# Altium PCB SOM_PCB.PcbDoc (part 5 of 5)
Units mil, origin at the board's own origin, x right, y up, seen from the top; angles counter-clockwise.
Board outline 6000 x 4000 mil, 8 copper layers (Top Layer, Int1 (Sign), Int2 (GND), Int3 (Sign), Int4 (Sign), Int5 (PWR), Int6 (Sign), Bottom Layer), stack 60.424 mil thick; 76 components, 194 nets, 972 pads, 571 vias.
Unrouted connection lines stored in the file: 54.
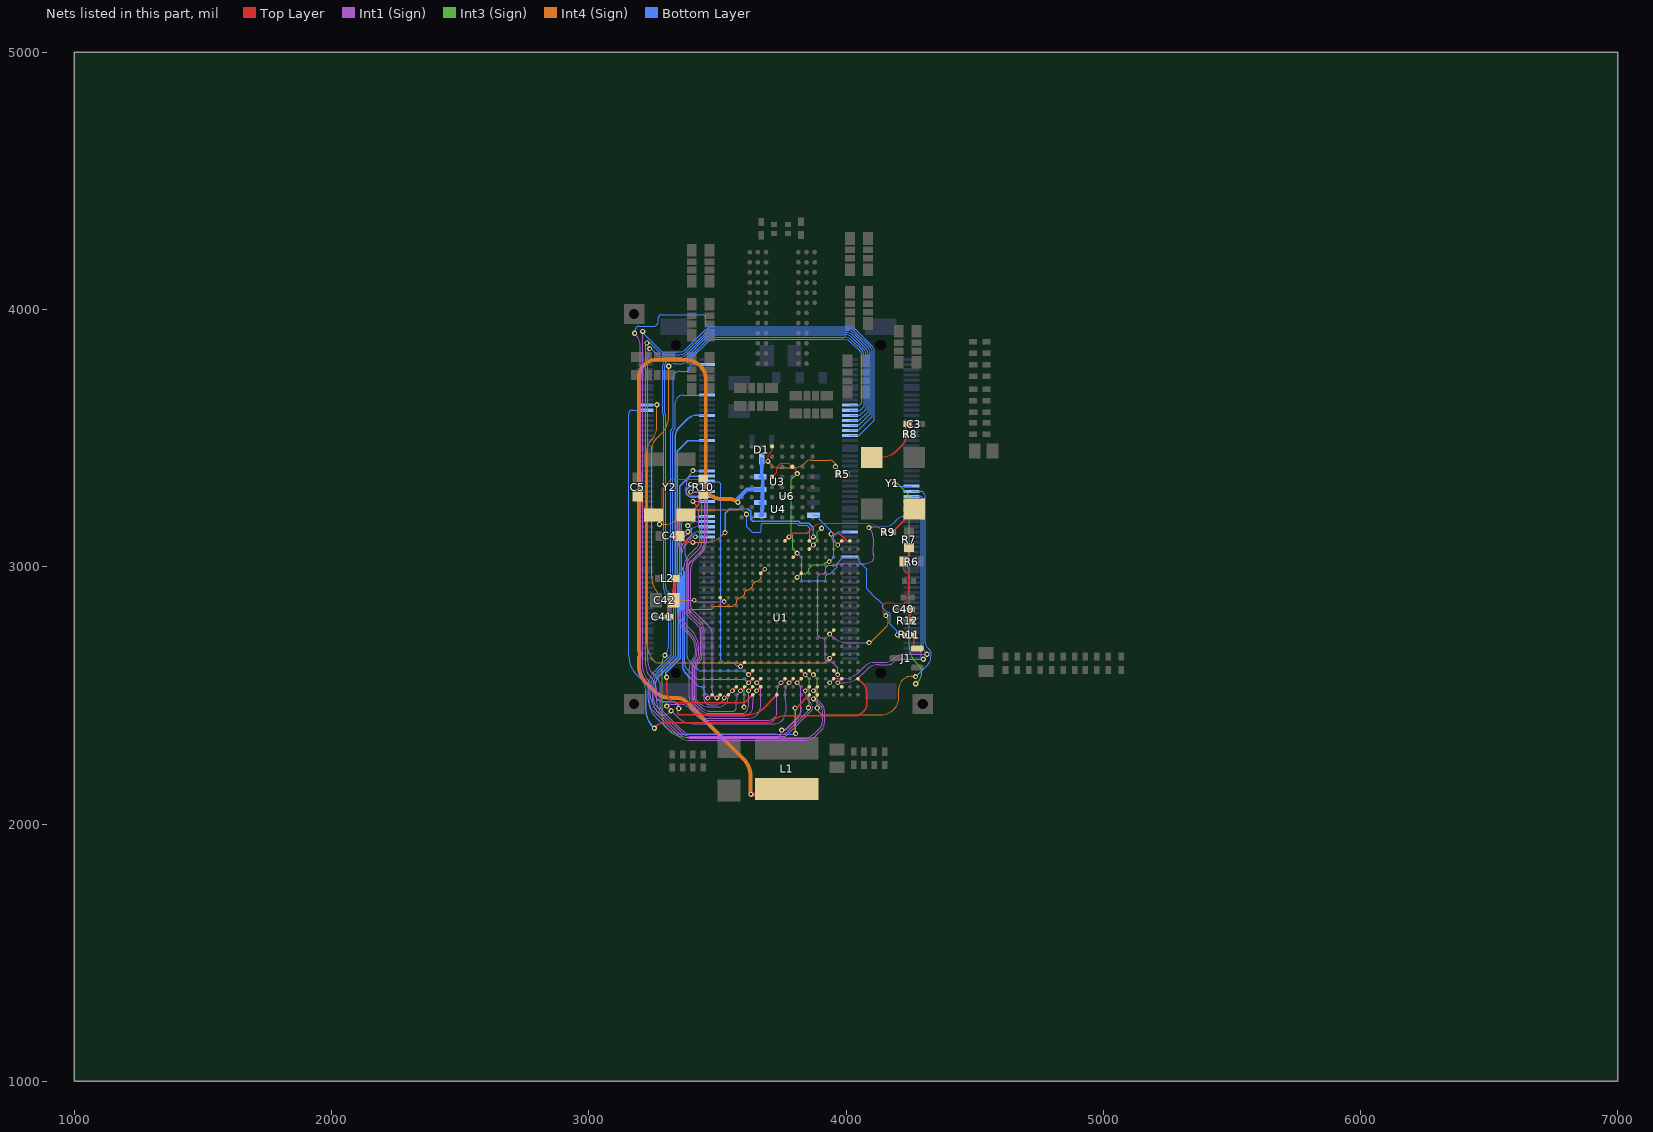
[diagram p10: the nets of this part, all layers, seen from the top]

## Via types
v1: diameter 19, hole 10, Top Layer to Bottom Layer, 330 vias
v2: diameter 20, hole 10, Top Layer to Bottom Layer, 235 vias
v3: diameter 23, hole 11.81, Top Layer to Bottom Layer, 6 vias

## Nets (pads, with @x,y where several pads share a name; then routed paths per layer and width w, separated by ;. In a path a pad name is that pad's centre, name@x,y a point inside that pad or via, vN(x,y) a via of type N, cw(c..) or ccw(c..) an arc to the next point about the centre after c; other vN are vias at no path point) (continued)
NetC3_2: C3.2 R8.2 Y1.1 | length 222.2
  Top Layer w5: Y1.1@4100,3425 4134.64,3425 ccw(c4134.64,3510.36) 4194.96,3449.96 ccw(c4134.64,3510.36) 4195,3450 4220,3475 ccw(c4189.87,3505.13) 4232.48,3505.13 R8.2@4232.48,3515 4232.48,3538.69 cw(c4255.55,3538.69) C3.2@4239.24,3555
NetC4_2: C4.2 R10.1 U1.A14 Y2.1 | length 941.3
  Top Layer w5: v2(3405,3095) 3375.5,3095 C4.2@3350.5,3120 3350.5,3178.64 3373.59,3201.73 Y2.1@3377.99,3201.73 3389.8,3201.73 3428.21,3240.14 3428.21,3265.45 3442.64,3279.88 R10.1@3445,3279.88 ; U1.A14@3857.48,3100.47 v1(3873.23,3116.22)
  Int4 (Sign) w3: v2(3405,3095) 3450.61,3095 ccw(c3450.61,3195) 3508.37,3113.37 ccw(c3450.61,3195) 3521.32,3124.29 v1(3529.67,3132.64)
  Bottom Layer w3: v1(3529.67,3132.64) 3529.67,3134.67 3530,3135 v1@3530,3140 ; v1(3873.23,3116.22) 3873.23,3140
  Bottom Layer w5: v1@3530,3140 3530,3207.2 3546.92,3224.12 3547.8,3224.5 cw(c3549.78,3219.91) 3550.96,3224.77 ccw(c3554.64,3240.86) 3554.8,3224.36 3617.86,3225 cw(c3617.93,3220) 3620.16,3224.47 3620.88,3224.12 3629.75,3215.25 3629.75,3185.25 3637.5,3177.5 3815.48,3177.5 3822.98,3170 3854.97,3170 3873.23,3151.74 3873.23,3140
NetC5_2: C5.2 R10.2 U1.B14 Y2.4 | length 1324.1
  Top Layer w4: C5.2@3190,3274.5 3208,3256.5 3208,3233.93 3240.2,3201.73 Y2.4@3252.01,3201.73 3255.28,3205 Y2.4@3260.93,3205 ; v2(3275,3165) 3275,3190.93 Y2.4@3260.93,3205 ; R10.2@3445,3340.12 3320.12,3340.12 3285.5,3305.5 3285.5,3225.32 3265.18,3205 Y2.4@3260.93,3205
  Top Layer w5: U1.B14@3857.48,3068.98 v1(3873.23,3084.72)
  Int3 (Sign) w3: v1(3873.23,3084.72) 3888.98,3100.47 3888.98,3135.83 3893.14,3140
  Int3 (Sign) w4: 3893.14,3140 3903.14,3150 v2(3905,3150)
  Int4 (Sign) w4: v2(3275,3165) 3299.5,3165 ccw(c3299.5,3214.49) 3334.48,3179.48 3362.86,3207.86 cw(c3395,3175.72) 3395,3221.17 3585,3221.17 cw(c3585,3193.98) 3604.19,3213.25 cw(c3585,3193.98) 3604.23,3213.21 v2(3613.25,3204.18)
  Bottom Layer w3: 3630.18,3140 3635.18,3135 3667.66,3135 3670,3137.34 3670,3140 ; 3859.23,3140 3859.23,3098.72 v1(3873.23,3084.72)
  Bottom Layer w4: v2(3613.25,3204.18) 3615,3202.44 3615,3155.18 3630.18,3140 ; 3670,3140 3670,3164 3675,3169 3808.98,3169 3816.48,3161.5 3846.94,3161.5 3859.23,3149.22 3859.23,3140
NetC40_2: C40.2 R12.1 | length 47.8
  Top Layer w4: C40.2@4250.76,2835 4250.76,2796.76 R12.1@4257.52,2790
NetC41_2: C41.2 C42.2 L2.2 U1.E8 | length 567.5
  Top Layer w5: U1.E8@3668.5,2974.49 v1(3684.25,2990.24)
  Top Layer w12: C41.2@3310.76,2805 C42.2@3310.76,2845 ; C42.2@3316.56,2851.44 3329.41,2864.29 C42.2@3329.41,2870 3329.41,2911.13 3335.51,2917.23 L2.2@3335.51,2955
  Int4 (Sign) w3: 3395,2834 3476.01,2834 3488.76,2846.76 3560.57,2846.76 3574.61,2860.8 3574.61,2868.9 3585.16,2879.44 3593.26,2879.44 3606.15,2892.33 3606.15,2900.44 3616.74,2911.02 3624.84,2911.02 3637.81,2924 3637.81,2932.1 3648.56,2942.85 3656.66,2942.85 3669.97,2956.15 3669.97,2975.95 v1(3684.25,2990.24)
  Int4 (Sign) w4: 3395,2820 3395,2834
NetD1_1: D1.1 L1.1 U6.5 U6.6 U6.7 U6.8 | length 3271.5
  Top Layer w15: v2(3630,2115) 3748.74,2115 L1.1@3770,2136.26
  Int4 (Sign) w3: 3395,2460 3400,2455
  Int4 (Sign) w15: 3395,2460 3382.7,2472.3 ccw(c3340.81,2430.4) 3340.81,2489.65 3321.77,2489.65 cw(c3321.77,2589.65) 3251.06,2518.94 3224.29,2545.71 cw(c3295,2616.42) 3195,2616.42 3195,2649.59 3198.25,2652.85 3198.25,2670.66 3195,2673.91 3195,3736.72 cw(c3263.28,3736.72) 3215,3785 cw(c3263.28,3736.72) 3263.28,3805 3374.64,3805 cw(c3374.64,3719.64) 3435,3780 cw(c3386.72,3731.72) 3455,3731.72 3455,3309.14 ccw(c3489.14,3309.14) 3465,3285 ccw(c3517.24,3337.24) 3517.24,3263.36 3547.74,3263.36 cw(c3547.74,3217.74) 3570.28,3257.41 cw(c3547.74,3217.74) v2(3580,3250) ; 3400,2455 3599.75,2255.25 cw(c3529.04,2184.54) 3629.04,2184.54 3629.04,2115.96 v2(3630,2115)
  Bottom Layer w15: v2(3580,3250) 3580,3265 3615,3300 U6.7@3666.75,3300 U6.7@3672.5,3300 ; U6.5@3666.75,3200 3672.5,3200 3675,3202.5 3675,3204.59 3673.5,3206.09 3673.5,3223.91 3675,3225.41 3675,3247.5 U6.6@3672.5,3250 ; U6.6@3666.75,3250 U6.6@3672.5,3250 ; U6.8@3666.75,3350 U6.8@3669.9,3350 ; D1.1@3672.4,3420 3672.4,3352.5 U6.8@3669.9,3350 ; U6.8@3669.9,3350 3674,3350 3676.5,3347.5 3676.5,3302.5 3674,3300 U6.7@3672.5,3300 ; U6.6@3672.5,3250 3675,3252.5 3675,3297.5 U6.7@3672.5,3300
NetJ1_2: J1.2 R11.1 | length 61.6
  Top Layer w5: R11.1@4262.52,2735 4262.52,2691.26 4271.38,2682.4 J1.2@4276.73,2682.4
NetR5_1: R5.1 U3.A4 | length 394.8
  Top Layer w4: v2(3696.4,3409.75) 3697.11,3410.71 3698.02,3411.62 3698.02,3435.78 3712.52,3450.28 U3.A4@3712.52,3467.48 ; v2(3959.13,3389.22) 3959.97,3388.34 3961.17,3386.64 3970,3377.81 R5.1@3970,3360
  Int4 (Sign) w4: v2(3696.4,3409.75) 3711.35,3394.79 ccw(c3735,3418.44) 3735,3385 3795.67,3385 ccw(c3795.67,3449.78) 3841.47,3403.97 ; 3841.5,3404 3843.66,3406.16 cw(c3865,3384.82) 3865,3415 3934.39,3415 cw(c3934.39,3389.39) 3952.5,3407.5 3952.93,3407.07 3960,3400 3960,3391.59 3959.54,3390.12 v2(3959.13,3389.22)
NetR6_1: R6.1 R7.1 U1.M17 | length 706
  Top Layer w4: v2(4155,2810) 4144,2821 4144,2851.63 4153.37,2861 4182.51,2861 4187.49,2856.03 4225.23,2856.03 4230.07,2860.87 4233.68,2860.87 4238.52,2865.7 4238.52,2891.34 4243.52,2896.34 4243.52,2969.54 4224.88,2988.17 R6.1@4224.88,3020 4224.88,3022.36 4245,3042.48 R7.1@4245,3074.88
  Top Layer w5: v1(3936.22,2738.27) U1.M17@3951.97,2754.02
  Int1 (Sign) w3: v1@3937.95,2740 v1(3936.22,2738.27) 3940.2,2734.29 ccw(c4010.91,2805) 4010.91,2705 v2@4080,2705
  Int1 (Sign) w4: v2@4080,2705 v2(4090,2705)
  Int4 (Sign) w4: v2(4090,2705) ccw(c4090,2717.07) 4098.54,2708.54 4157.32,2767.32 ; v2(4155,2810) cw(c4130.86,2785.86) 4165,2785.86 cw(c4138.79,2785.86) 4157.33,2767.33
NetR9_1: R9.1 Y1.3 | length 124.3
  Top Layer w5: R9.1@4182.52,3135 4182.52,3136.77 4226.52,3180.77 4226.52,3186.16 Y1.3@4265.35,3225
NetR9_2: R9.2 U1.A11 | length 425.2
  Top Layer w4: 3859.64,3140 3874.83,3155.18 cw(c3909.78,3120.23) 3909.78,3169.66 4082.27,3169.66 ; R9.2@4139.44,3143.04 R9.2@4141.4,3141.08 ; R9.2@4147.48,3135 R9.2@4141.4,3141.08 ; 4082.27,3169.66 cw(c4082.3,3165.66) 4082.33,3169.66 ; 4082.27,3169.66 4082.33,3169.66 ; 4082.33,3169.66 cw(c4082.3,3165.66) 4082.81,3169.63 cw(c4070.69,3070.37) 4083.94,3169.48 cw(c4070.69,3070.37) R9.2@4141.4,3141.08
  Top Layer w5: U1.A11@3762.99,3100.47 v1(3778.74,3116.22) 3793.74,3131.22 3822.98,3131.22 3824.2,3130 3849.64,3130 3859.64,3140
NetU1_A18: U1.A18 U1.A19 U6.4 | length 270.7
  Top Layer w5: v1(3941.9,3127.26) 3943.15,3128.51 3975.68,3128.51 4003.72,3100.47 U1.A19@4014.96,3100.47 ; v1(3967.72,3084.72) U1.A18@3983.46,3100.47
  Int1 (Sign) w3: v1(3941.9,3127.26) 3945.77,3123.39 3945.77,3106.67 v1(3967.72,3084.72)
  Bottom Layer w3: 3940,3140 3942.13,3137.87 3942.13,3130.02 3941.9,3129.79 v1(3941.9,3127.26)
  Bottom Layer w4: U6.4@3873.25,3200 3888,3200 3896,3192 3896,3184 3940,3140
PB2: U1.T6 U4.121 | length 851.4
  Top Layer w5: v1(3589.76,2612.28) U1.T6@3605.51,2628.03
  Bottom Layer w3: 3512.77,3140 3512.77,2637.98 3524.09,2626.66 3563.69,2626.66 3575.76,2614.59 3587.46,2614.59 v1(3589.76,2612.28)
  Bottom Layer w4: U4.121@3459.88,3332.8 3462.68,3330 3505,3330 3512.77,3322.23 3512.77,3140
RESET: R11.2 U1.C12 U3.C6 U3.D4 U4.67 | length 1286.9
  Top Layer w4: U3.D4@3712.52,3349.37 3730.45,3367.3 3730.45,3387.8 3745.88,3403.24 3776.76,3403.24 U3.C6@3791.26,3388.74 3810.22,3369.78 v2(3810.22,3362.22) ; v2(4200,2735) R11.2@4227.48,2735
  Top Layer w5: U1.C12@3794.49,3037.48 v1(3810.24,3053.23)
  Int3 (Sign) w3: 3787.9,3140 3787.9,3126.86 3792.74,3122.02 3792.74,3070.72 v1(3810.24,3053.23)
  Int3 (Sign) w4: 3787.9,3140 3787.9,3340.52 3809.6,3362.22 v2(3810.22,3362.22)
  Bottom Layer w3: v1(3810.24,3053.23) 3827.73,3035.73 3827.73,2947.27 3830,2945 3870.13,2945 3870.39,2944.74 3918.24,2944.74 3922.22,2948.72 3922.22,2964.54 3930.42,2972.74 3938.52,2972.74 3965.2,2999.41 3965.2,3013.31 3989.41,3037.52 U4.67@4015,3037.52 4033.23,3037.52 cw(c4033.23,3019.75) 4045.8,3032.31 4051,3027.11 4051,3019.2 4080,2990.2 4080,2965
  Bottom Layer w4: 4080,2965 4080,2916.03 4080,2914.37 4111.93,2880.95 ccw(c4123.5,2892) 4114.2,2878.98 4118.37,2876 4120.03,2876 4121.63,2876 4142.56,2855.06 4142.56,2839.81 4156.37,2826 4161.63,2826 4171.22,2816.41 4171.22,2776.15 4196.94,2750.43 4196.94,2738.06 v2(4200,2735)
RSCLK0: U1.H3 U4.93 | length 2252
  Top Layer w5: U1.H3@3511.02,2880 v1(3526.77,2864.25)
  Int1 (Sign) w3: v1(3410,2870) 3415.75,2864.25 v1(3526.77,2864.25)
  Int4 (Sign) w3: 3395,2870 v1(3410,2870)
  Int4 (Sign) w4: 3259.12,3494.12 ccw(c3293.28,3460) 3245,3460 3245,2961.42 ccw(c3345,2961.42) 3274.29,2890.71 ccw(c3324.29,2940.71) 3324.29,2870 3395,2870 ; 3259.14,3494.14 3281.4,3516.4 ccw(c3210.69,3587.11) 3297.61,3537.67 ccw(c3210.69,3587.11) 3310.69,3587.11 v2(3310.69,3779.34)
  Bottom Layer w4: v2(3310.69,3779.34) cw(c3333.23,3756.8) 3318.72,3785.19 cw(c3333.23,3756.8) 3333.23,3788.68 3352.71,3788.68 ccw(c3352.71,3848.21) 3368.28,3790.75 cw(c3369.32,3786.89) 3368.56,3790.82 ccw(c3360,3835.11) 3391.85,3803.16 ccw(c3360,3835.11) 3391.89,3803.2 3399.34,3810.66 3464.34,3875.66 ; 3464.37,3875.68 cw(c3486.12,3853.88) 3486.12,3884.68 3985,3884.68 cw(c3985,3830.5) 4023.3,3868.82 4054.74,3837.37 cw(c4037.23,3819.86) 4062,3819.86 4062,3638.48 4051.59,3628.07 U4.93@4015,3628.07
SCL1: U1.W5 U4.119 | length 1255
  Top Layer w5: v1(3558.27,2517.8) U1.W5@3574.02,2533.54
  Int1 (Sign) w3: 3395.02,2812.98 3429,2779 3431.42,2776.58 3431.5,2776.49 cw(c3409.88,2755) 3440.37,2755 3440.37,2661.89 cw(c3387.92,2661.89) 3431.06,2632.06 cw(c3387.92,2661.89) 3425.49,2625.29 cw(c3387.92,2661.89) 3425.01,2624.81 3422.37,2622.17 ccw(c3432.28,2612.28) 3418.28,2612.28 3418.27,2482.7 ; 3395,3035 3429.39,3069.39 ccw(c3403.79,3095) 3440,3095 3440,3140 ; 3418.29,2482.68 cw(c3416.18,2480.54) 3419.02,2481.51 ccw(c3432.28,2486) 3427.08,2473 ccw(c3470.54,2516.47) 3431.72,2468.81 ccw(c3470.54,2516.47) 3470.54,2455 ; 3498.79,2455 ccw(c3498.79,2506.21) 3535,2470 ccw(c3521.07,2483.93) 3540.77,2483.93 3540.77,2488.16 cw(c3570.08,2488.16) 3549.36,2508.88 v1(3558.27,2517.8)
  Int1 (Sign) w4: 3395.02,2812.98 cw(c3397.51,2815.44) 3394.92,2813.09 3380.21,2829.29 cw(c3386.5,2835) 3378,2835 3378,2995 cw(c3425,2995) 3380.94,3011.37 3386.32,3025.8 cw(c3390.07,3024.41) 3387.19,3027.19 3395,3035 ; v2(3405,3374) ccw(c3471.26,3307.74) 3377.55,3307.74 3377.55,3299.8 ccw(c3412.51,3299.8) 3387.79,3275.08 ccw(c3400.07,3287.36) 3400.07,3270 3417.53,3270 cw(c3417.53,3251.98) 3425.51,3268.14 cw(c3417.53,3251.98) 3430.28,3264.72 3435,3260 cw(c3422.93,3247.93) 3440,3247.93 3440,3140 ; 3470.54,2455 3498.79,2455
  Bottom Layer w4: v2(3405,3374) 3406,3374 3406.42,3373.58 3458.46,3373.58 U4.119@3459.88,3372.17
SD_CLK: U1.Y15 U4.88 | length 3684.8
  Top Layer w5: v1(3873.23,2486.3) U1.Y15@3888.98,2502.05
  Int1 (Sign) w3: v1(3873.23,2486.3) 3904.53,2455
  Int1 (Sign) w4: v2(3210,3915) 3210,2607.73 ccw(c3276.95,2607.73) 3229.61,2560.39 cw(c3182.27,2513.05) 3249.22,2513.05 3249.22,2475.43 ccw(c3300.43,2475.43) 3264.22,2439.22 3354.22,2349.22 cw(c3353.11,2345.37) 3355.59,2348.51 ccw(c3400,2404.51) 3400,2333.04 ; 3400,2333 3830.34,2333 ccw(c3830.34,2399.78) 3877.56,2352.56 3897.12,2372.12 ccw(c3869.24,2400) 3908.67,2400 3908.67,2440 ccw(c3881.53,2440) 3906.06,2451.62 cw(c3913.31,2455) 3905.73,2452.45 ; 3904.53,2455 3904.77,2454.76 3904.81,2454.7 cw(c3901.61,2452.3) 3905.51,2453.2 ccw(c3913.31,2455) 3905.72,2452.45
  Bottom Layer w4: v2@3213.06,3905.63 3275.69,3843 ccw(c3295,3862.31) 3295,3835 3335.21,3835 cw(c3335.24,3831) 3335.82,3834.96 ccw(c3339.8,3862.32) 3339.8,3834.67 ccw(c3339.8,3862.32) 3343.79,3834.96 cw(c3344.37,3831) 3344.4,3835 3356.23,3835 ccw(c3351.26,3872.16) 3377.77,3845.65 3451.06,3918.94 cw(c3466.98,3903.02) 3466.98,3925.53 4010,3925.53 cw(c4010,3893.78) 4032.43,3916.25 ; U4.88@4015,3529.65 4017.21,3531.86 4050.15,3531.86 4100.83,3582.54 ccw(c4098,3585.36) 4102,3585.36 4102,3832.32 ccw(c4067.32,3832.32) 4091.79,3856.9 4036.91,3911.78 ccw(c4003.79,3878.79) 4036.78,3911.91 4032.46,3916.22
SD_CMD: U1.W15 U4.87 | length 3844.5
  Top Layer w5: v1(3873.23,2517.8) U1.W15@3888.98,2533.54
  Int1 (Sign) w3: v1(3873.23,2517.8) 3888.98,2502.05 3888.98,2482.25 3906.38,2464.85 cw(c3881.53,2440) 3913.31,2455
  Int1 (Sign) w4: v2(3178,3907.84) cw(c3122.68,3852.51) 3200,3864.45 3200,2594.75 ccw(c3259.75,2594.75) 3217.5,2552.5 ; 3217.53,2552.47 cw(c3175.25,2510.25) 3235,2510.25 3235,2476.21 ccw(c3286.21,2476.21) 3250,2440 3345,2345 ccw(c3393.28,2393.28) 3393.28,2325 3840,2325 ccw(c3840,2385.36) 3882.68,2342.68 3903.71,2363.71 ; 3903.73,2363.73 ccw(c3872.41,2395) 3916.67,2395 3916.67,2440 ccw(c3881.53,2440) 3913.31,2455
  Bottom Layer w4: v2(3178,3907.84) 3180.23,3910.07 3180.23,3920.23 cw(c3195.27,3920.23) 3195.27,3935.27 3252.77,3935.27 ccw(c3252.77,3952.36) 3269.86,3952.36 3269.86,3964.86 cw(c3285,3964.86) 3285,3980 3440,3980 cw(c3440,3965) 3455,3965 3455,3945 ccw(c3466.47,3945) 3466.47,3933.53 4010,3933.53 cw(c4010,3893.78) 4038.08,3921.92 4100,3860 cw(c4075.86,3835.86) 4110,3835.86 4110,3569.89 4050.57,3510.47 4015.51,3510.47 U4.87@4015,3509.96
SD_D0: U1.Y14 U4.92 | length 3266.9
  Top Layer w5: v2(3802.31,2451) 3809.58,2454.15 U1.Y14@3857.48,2502.05
  Int4 (Sign) w5: v2(3802.31,2451) 3802.61,2450.7 3802.61,2353.05 v2(3804.21,2351.44)
  Bottom Layer w4: 3251.21,2588.84 ccw(c3300.11,2540) 3231,2540 3231,2485.42 ccw(c3331,2485.42) 3231.64,2474.15 ccw(c3331,2485.42) 3260.29,2414.71 3296.71,2378.29 ccw(c3367.42,2449) 3356.15,2349.64 ccw(c3367.42,2449) 3367.42,2349 v2@3799.31,2349 ; 3251.24,2588.87 3320,2657.63 3320,2875.15 ccw(c3284.15,2875.15) 3309.53,2900.47 ; 3299.36,3793.3 ccw(c3310.69,3782) 3294.69,3782 3294.69,3599.68 ccw(c3302.05,3599.68) 3296.84,3594.47 cw(c3291.64,3589.26) 3299,3589.26 3299,2920 ccw(c3320.73,2920) 3305.36,2904.64 3309.5,2900.5 ; 3299.39,3793.33 cw(c3310.69,3782) 3310.69,3798 3360,3798 ccw(c3360,3835.11) 3386.24,3808.87 3456.19,3878.81 3458.66,3881.28 cw(c3486.12,3853.88) 3458.75,3881.37 cw(c3486.12,3853.88) 3484.24,3892.63 ; 3484.54,3892.66 cw(c3490.49,3844.51) 3490.49,3893.02 3992.51,3893.02 cw(c3992.51,3852.89) 4020.9,3881.27 cw(c3985,3830.5) 4028.94,3874.49 cw(c3985,3830.5) 4028.98,3874.45 4034.22,3869.22 4060.39,3843.04 ; U4.92@4015,3608.39 4054.95,3608.39 4070,3623.43 4070,3819.86 ccw(c4037.23,3819.86) 4060.5,3842.93 ccw(c4054.74,3837.37) 4060.41,3843.02
SD_D1: U1.V13 U4.91 | length 3304.6
  Top Layer w5: v1(3810.24,2549.29) U1.V13@3825.98,2565.04
  Int1 (Sign) w3: v1(3810.24,2549.29) 3818.26,2541.26 cw(c3802,2525) 3825,2525 3825,2455
  Int1 (Sign) w5: v2(3750,2365) ccw(c3750,2397.19) 3756.71,2365.71 ccw(c3750,2397.19) 3772.76,2374.43 3811.67,2413.33 ; 3811.69,2413.36 ccw(c3779.48,2445.52) 3825,2445.52 3825,2455
  Int3 (Sign) w4: v2@3292.14,2651.68 ccw(c3321.4,2630.88) 3285.5,2630.88 3285.5,2422.08 ccw(c3352.08,2422.08) 3285.87,2415.09 ccw(c3345.31,2415.09) 3286.01,2410.93 ccw(c3354.32,2419.32) 3304.59,2371.75 ccw(c3307.48,2374.51) 3304.66,2371.68 3308.61,2367.73 3312.59,2363.75 ccw(c3376.42,2430) 3376.42,2338 3735.17,2338 ccw(c3735.17,2344.83) 3740,2340 ccw(c3715.86,2364.14) 3750,2364.14 v2(3750,2365)
  Bottom Layer w4: 3293.69,3798.95 ccw(c3310.69,3782) 3286.69,3782 3286.69,3596.36 ccw(c3294.05,3596.36) 3288.84,3591.16 cw(c3283.64,3585.95) 3291,3585.95 3291,2915 ccw(c3341.7,2915) 3300.54,2885.39 cw(c3277.72,2862.56) 3304.58,2880.46 cw(c3277.72,2862.56) 3310,2862.56 3310,2690.03 cw(c3262.25,2690.03) v2(3296.02,2656.27) ; 3293.74,3798.99 cw(c3310.69,3782) 3309.99,3805.99 3360,3806 ccw(c3360,3835.11) 3380.57,3814.51 ; 3380.59,3814.53 3455.53,3889.47 ; 3455.55,3889.49 cw(c3484.65,3860.35) 3484.65,3901.53 3996.72,3901.53 cw(c3996.72,3861.72) 4024.86,3889.89 ; U4.91@4015,3588.7 4053.7,3588.7 4078,3613 4078,3825.25 ccw(c4050.25,3825.25) 4069.87,3844.87 4024.87,3889.87
SD_D2: U1.U13 U4.90 | length 3477.2
  Top Layer w5: U1.U13@3825.98,2596.54 v1(3841.73,2580.79)
  Int1 (Sign) w4: v2(3236.73,3848) ccw(c3265.06,3819.67) 3229.15,3837.43 ccw(c3232.73,3835.65) 3228.73,3835.65 3228.73,3810 3228.73,2635 ccw(c3301.16,2635) 3249.95,2583.79 3264.33,2569.41 cw(c3229.61,2534.69) 3278.7,2534.69 3278.7,2453.78 ccw(c3290.7,2453.78) 3281.81,2445.73 3295.96,2430.11 ccw(c3298.91,2432.8) 3296.07,2429.99 3355.53,2370.53 3359.34,2366.72 ccw(c3400,2407.39) 3400,2349.88 3724.99,2349.88 3743.37,2349 3756.63,2349 ccw(c3756.63,2362.49) 3766.17,2352.95 3798.22,2385 3846.9,2433.69 ccw(c3828.94,2451.65) 3852.29,2441.65 ccw(c3828.94,2451.65) v2(3854.34,2451.65)
  Int3 (Sign) w3: v1(3841.73,2580.79) 3857.48,2565.04 v2@3857.48,2455
  Bottom Layer w4: v2(3236.73,3848) 3241.5,3847.87 3243.15,3847.82 3258.67,3831.41 3260.99,3829.09 ccw(c3295,3863.1) 3295,3815 3355,3815 ccw(c3355,3850.6) 3380.15,3825.41 ; 3380.17,3825.43 3449.87,3895.13 ; 3449.89,3895.14 cw(c3484.65,3860.35) 3484.65,3909.53 4003.79,3909.53 cw(c4003.79,3878.79) 4025.51,3900.55 ; U4.90@4015,3569.02 4051.43,3569.02 4086,3603.59 4086,3825.25 ccw(c4050.25,3825.25) 4075.55,3850.51 ; 4025.53,3900.53 4075.53,3850.53
SD_D3: U1.W14 U4.89 | length 3518.2
  Top Layer w5: v1(3841.73,2517.8) U1.W14@3857.48,2533.54
  Int1 (Sign) w3: v1(3841.73,2517.8) ccw(c3905.14,2517.8) 3859.23,2474.06 ccw(c3905.14,2517.8) 3860.3,2472.96 3862.42,2470.84 ; 3862.43,2470.84 cw(c3843.29,2451.72) 3870.14,2455
  Int1 (Sign) w4: v2(3226,3870) 3226,3865.67 3220.73,3860.4 3220.73,2620.49 ccw(c3294.35,2620.49) 3242.3,2568.44 cw(c3190.24,2516.38) 3263.86,2516.38 3263.86,2473.69 ccw(c3316.64,2473.69) 3275.68,2440.4 ccw(c3316.64,2473.69) 3279.32,2436.37 3287.93,2426.82 ccw(c3290.88,2429.52) 3288.03,2426.72 ccw(c3290.92,2429.48) 3288.07,2426.67 3355.12,2359.63 ccw(c3400,2404.51) 3355.18,2359.57 ccw(c3400,2404.51) 3400,2341.04 3742.13,2341.04 cw(c3742.27,2337.04) 3742.46,2341.03 3743,2341.01 ccw(c3743.37,2349) 3743.37,2341 3756.63,2341 ccw(c3756.63,2362.49) 3771.81,2347.28 3783.58,2359.05 3858.25,2433.72 ; 3858.26,2433.73 cw(c3860.7,2431.22) 3858.38,2433.84 3864.96,2439.68 ccw(c3854.34,2451.65) 3865.64,2440.32 ; 3865.67,2440.35 ccw(c3854.34,2451.65) 3870.34,2451.65 ccw(c3854.34,2451.65) 3870.34,2451.72 ; 3870.14,2455 cw(c3843.29,2451.72) 3870.34,2451.74
  Bottom Layer w4: v2(3226,3870) 3237.37,3870 3273.69,3833.69 ; 3273.7,3833.67 ccw(c3294.66,3854.66) 3294.66,3825 3353.18,3825 ccw(c3353.18,3861.82) 3379.2,3835.77 3444.19,3900.76 cw(c3484.65,3860.35) 3484.65,3917.53 4003.79,3917.53 cw(c4003.79,3878.79) 4031.21,3906.16 4086.19,3851.19 cw(c4067.32,3832.32) 4086.23,3851.14 cw(c4067.32,3832.32) 4094,3832.32 4094,3594 4050.15,3550.15 4015.82,3550.15 U4.89@4015,3549.33
SDA1: U1.Y2 U4.120 | length 1017.1
  Top Layer w5: v1(3462.32,2488.78) 3464.29,2488.78 3477.56,2502.05 U1.Y2@3479.53,2502.05
  Bottom Layer w3: 3395,2567.03 3420.68,2541.36 3421.11,2540.85 ccw(c3432.28,2549.29) 3423.84,2538.12 3424.35,2537.68 3425.7,2536.33 3426.25,2535 3435,2535 3449.78,2520.22 3449.78,2512 3463.78,2498 3463.78,2492.31 v1(3462.32,2488.78)
  Bottom Layer w5: 3395,2567.03 3387.59,2574.44 3380.23,2582.58 3378.01,2584.8 cw(c3408.22,2615) 3373.86,2589.62 cw(c3408.22,2615) 3365.5,2615 3365.5,2953.51 ccw(c3345.01,2953.51) 3359.5,2968 cw(c3373.99,2982.49) 3353.5,2982.49 3353.5,3313.5 3392.48,3352.48 U4.120@3459.88,3352.48
TACLK6: U1.Y7 U4.115 | length 1466.3
  Top Layer w5: v2(3302.7,2570.36) 3302.7,2521.36 ccw(c3361.62,2521.36) 3319.96,2479.7 ccw(c3340.23,2499.97) 3340.23,2471.3 3595.98,2471.3 ccw(c3595.98,2496.12) 3613.53,2478.57 3620.94,2485.98 ; U1.Y7@3637.01,2502.05 3620.98,2486.02 ; 3620.94,2485.98 ccw(c3594.37,2512.64) 3620.98,2486.02 ; 3620.94,2485.98 3620.98,2486.02
  Bottom Layer w5: v2(3302.7,2570.36) 3299.01,2574.06 3299.01,2588.07 3355.04,2644.09 ccw(c3351.47,2647.6) 3356.47,2647.58 3356.5,2652.18 ccw(c3342.5,2652.3) 3356.5,2652.3 3356.5,2951.02 ccw(c3339,2951.02) 3351.35,2963.42 3349.29,2965.48 cw(c3360.86,2977.05) 3344.5,2977.05 3344.5,3449.5 3385.28,3490.28 U4.115@3459.88,3490.28
TMR0: U1.W8 U4.127 | length 1183
  Top Layer w5: v1(3652.76,2517.8) U1.W8@3668.5,2533.54
  Int1 (Sign) w3: 3395,2741.38 cw(c3322.37,2672.64) 3422.37,2672.64 cw(c3419.37,2672.64) 3422.35,2672.25 3420.69,2659.13 cw(c3380.86,2664.14) 3417.82,2648.48 3414.47,2640.54 cw(c3411.71,2641.71) 3413.96,2639.73 ; 3395,3117.53 ccw(c3380.53,3131.99) 3400.99,3131.99 3400.99,3140 ; 3400.28,2482.12 ccw(c3439.75,2482.21) 3411.15,2455 ; 3400.28,2482.17 ccw(c3397.28,2482.13) 3400.28,2482.23 3400.02,2493.4 cw(c3462.32,2494.83) 3400,2494.83 3400,2612.56 cw(c3406,2612.57) 3400.37,2614.64 cw(c3432.28,2612.28) 3408.56,2633.76 3413.95,2639.71 ; 3637.13,2455 3637.13,2470.84 3637.07,2485.2 cw(c3677.88,2485.2) 3649.02,2514.06 v1(3652.76,2517.8)
  Int1 (Sign) w4: v2(3385,3160) 3398.16,3146.84 cw(c3391.32,3140) 3400.99,3140 ; 3395,2741.38 ccw(c3322.37,2672.64) 3393.08,2743.35 3383.29,2753.14 cw(c3454,2823.85) 3354,2823.85 3354,3055 cw(c3405.97,3055) 3369.22,3091.75 3395,3117.53 ; 3411.15,2455 ccw(c3439.75,2482.21) 3411.82,2454.31 3429.28,2436.85 ccw(c3470,2477.61) 3470,2420 3600,2420 ccw(c3600,2462.27) 3629.89,2432.38 ccw(c3612.42,2449.85) 3637.13,2449.85 3637.13,2455
  Bottom Layer w4: v2(3385,3160) cw(c3421.97,3123.03) 3398.4,3169.7 cw(c3421.97,3123.03) 3421.97,3175.31 U4.127@3459.88,3175.31
TMR1: U1.V8 U4.128 | length 1239.1
  Top Layer w5: v1(3652.76,2549.29) U1.V8@3668.5,2565.04
  Int1 (Sign) w3: 3395,2464.33 ccw(c3459.99,2490.31) 3399.56,2455 ; 3395,2625.86 cw(c3441.21,2603.79) 3405,2640 ccw(c3380.86,2664.14) 3415,2664.14 3415,2680 ccw(c3342.57,2680) 3395,2729.97 ; v1(3652.76,2549.29) 3662.46,2539.58 cw(c3647.88,2525) 3668.5,2525 3668.5,2458.52 cw(c3621.98,2458.52) 3668.37,2455
  Int1 (Sign) w4: v2(3385.5,3136) 3385.5,3130.5 3357.31,3102.31 ccw(c3384.63,3075) 3346,3075 3346,2819.15 ccw(c3442.94,2819.15) 3374.36,2750.64 ccw(c3442.94,2819.15) 3374.39,2750.61 3393.79,2731.21 cw(c3342.57,2680) 3395,2729.97 ; 3395,2464.33 cw(c3459.99,2490.31) 3390,2490.31 3390,2603.79 cw(c3441.21,2603.79) 3395,2625.86 ; 3399.56,2455 ccw(c3459.99,2490.31) 3410.5,2440.81 3424.69,2426.63 ccw(c3460,2461.94) 3460,2412 3621.98,2412 ccw(c3621.98,2458.52) 3654.88,2425.63 ccw(c3621.98,2458.52) 3668.37,2455
  Bottom Layer w4: v2(3385.5,3136) cw(c3432.89,3088.61) 3393.12,3142.55 cw(c3432.89,3088.61) 3432.89,3155.63 U4.128@3459.88,3155.63 U4.128@3457.7,3157.81
TMR2: U1.U7 U4.129 | length 841.2
  Top Layer w5: v1(3621.26,2580.79) U1.U7@3637.01,2596.54
  Bottom Layer w3: 3395,2629.77 3429.77,2595 3605,2595 3619.21,2580.79 v1(3621.26,2580.79) ; 3395,3117.37 3406.06,3128.44 ; 3406.08,3128.46 cw(c3424.17,3110.36) 3406.12,3128.49 cw(c3424.17,3110.36) 3424.17,3135.94 U4.129@3459.88,3135.94
  Bottom Layer w4: 3395,2629.77 3388.5,2636.27 cw(c3404.19,2651.96) 3382,2651.96 3382,3029.05 ccw(c3373.79,3029.05) 3379.6,3034.86 cw(c3390.69,3045.95) 3375,3045.95 3375,3085 cw(c3404.87,3085) 3383.75,3106.12 3395,3117.37
TMR3: U1.W7 U4.130 | length 1069.4
  Top Layer w5: v1(3621.26,2517.8) U1.W7@3637.01,2533.54
  Int1 (Sign) w3: 3395,2757.37 3399.08,2753.29 cw(c3328.37,2682.58) 3428.37,2682.58 3428.37,2661.89 cw(c3388.77,2661.89) 3419.41,2636.81 3416.77,2633.89 3413.01,2629.73 ccw(c3432.28,2612.28) 3409.62,2625.02 ccw(c3432.28,2612.28) 3406.33,2613.76 cw(c3403.33,2613.93) 3406,2612.56 3406,2494.83 ccw(c3462.32,2494.83) 3406.26,2489.44 cw(c3403.27,2489.15) 3406.27,2489.13 3406.27,2482.7 ccw(c3421.27,2482.7) 3406.94,2478.27 3407.92,2475.11 ccw(c3432.52,2482.7) 3413.81,2465.01 3416.24,2462.44 3423.28,2455 ; 3395,3106.18 3399.24,3110.42 ; 3399.25,3110.43 cw(c3414.74,3094.93) v1(3414.74,3116.84) ; 3621.1,2455 ccw(c3592.85,2458.03) 3621.26,2458.03 v1(3621.26,2517.8)
  Int1 (Sign) w4: 3395,2757.37 3385.38,2767 cw(c3440.65,2822.27) 3362.48,2822.27 cw(c3462,2832.05) 3362,2832.05 3362,3052.05 cw(c3410.44,3052.05) 3375.35,3085.45 cw(c3410.44,3052.05) 3376.19,3086.3 3390.37,3100.84 3393.41,3104.52 cw(c3405,3095) 3395,3106.18 ; 3423.28,2455 3428.48,2449.5 ccw(c3434.29,2455) 3428.62,2449.36 ccw(c3475.34,2496.04) 3431.05,2447.05 3431.09,2447.01 ccw(c3472.18,2488.13) 3459.36,2431.43 ccw(c3472.18,2488.13) 3472.18,2430 3593.77,2430 ccw(c3593.77,2457.11) 3612.92,2437.92 ; 3612.94,2437.94 ccw(c3592.85,2458.03) 3620,2449.66 ccw(c3592.85,2458.03) 3621.1,2455
  Bottom Layer w3: v1(3414.74,3116.84) 3452.98,3116.84 3456.14,3120 U4.130@3459.88,3116.26
TMR4: U1.V12 U4.102 | length 2195.6
  Top Layer w5: v1(3778.74,2549.29) U1.V12@3794.49,2565.04
  Int1 (Sign) w3: 3764.74,2486.26 3764.83,2455 ; 3764.74,2486.3 3764.74,2517.8 cw(c3778.74,2517.8) 3764.74,2517.96 3764.84,2526.14 cw(c3787.16,2526.14) 3764.84,2526.66 cw(c3787.16,2526.14) 3771.37,2541.92 v1(3778.74,2549.29)
  Int1 (Sign) w4: v2(3320,2440) 3341.71,2418.29 ccw(c3412.42,2489) 3366.82,2400 ccw(c3412.42,2489) 3412.42,2389 3718.42,2389 ccw(c3718.42,2435.51) 3751.31,2402.62 ; 3751.34,2402.65 ccw(c3718.54,2435.39) 3764.88,2435.39 3764.88,2437.27 3764.83,2455
  Bottom Layer w4: v2(3320,2440) 3312.07,2432.07 cw(c3295,2449.14) 3295,2425 cw(c3295,2461.21) 3269.39,2435.61 3264.27,2440.73 cw(c3325.27,2501.73) 3247.83,2463.72 cw(c3325.27,2501.73) 3239,2501.73 3239,2526.49 cw(c3332.74,2526.49) 3266.44,2592.75 3329.83,2656.14 ccw(c3327,2658.97) 3331,2658.97 3331,2934.57 ccw(c3302.52,2934.57) 3322.66,2954.71 cw(c3331.49,2963.54) 3319,2963.54 3319,3529.02 cw(c3327,3529.02) 3321.35,3534.68 3321.65,3534.98 ccw(c3303.93,3552.72) 3329,3552.72 3329,3735 cw(c3354,3735) 3354,3760 3380.07,3760 ccw(c3380.07,3769) 3389.07,3769 cw(c3405.62,3769) 3405.62,3785.55 U4.102@3459.88,3785.55
TMR5: U1.V11 U4.106 | length 2018.6
  Top Layer w5: v1(3747.24,2549.29) U1.V11@3762.99,2565.04
  Int1 (Sign) w3: 3731.5,2455 3731.5,2515 cw(c3776.26,2515) 3744.61,2546.66 v1(3747.24,2549.29)
  Int1 (Sign) w4: v2(3303.16,2458.5) 3304.55,2460.6 cw(c3317.28,2444.38) 3317.28,2465 3356.26,2465 cw(c3356.26,2419.77) 3388.25,2451.75 3422.59,2417.41 ccw(c3455,2449.87) 3455,2404 3621.98,2404 ccw(c3621.98,2458.52) 3627,2404.23 cw(c3627.36,2400.25) 3627.39,2404.25 3700,2404.25 ccw(c3700,2438.04) 3723.9,2414.15 ccw(c3705.55,2432.49) 3731.5,2432.49 3731.5,2455
  Bottom Layer w4: v2(3303.16,2458.5) 3282.55,2450.28 cw(c3281.07,2454) 3281.07,2450 3277.07,2450 cw(c3277.07,2467.07) 3265,2455 cw(c3301.21,2491.21) 3264.56,2455.45 cw(c3301.21,2491.21) 3263.33,2456.75 cw(c3301.21,2491.21) 3250,2491.21 3250,2545 cw(c3298.28,2545) 3250.24,2549.85 cw(c3332.74,2526.49) 3272.11,2587.11 3339,2654 3339,2942.54 ccw(c3318.51,2942.54) 3333.03,2957 3330.89,2959.13 cw(c3340.5,2968.62) 3327,2968.61 3327,3521.95 cw(c3344.07,3521.95) 3332,3534.02 ccw(c3319.93,3546.09) 3337,3546.09 3337,3637 cw(c3367.44,3637) 3367.44,3667.44 U4.106@3459.88,3667.44
TMR6: U1.Y10 U4.110 | length 1755.4
  Top Layer w5: v2@3346.3,2440.56 3346.3,2429.25 3350.55,2425 3618.7,2425 ccw(c3618.7,2511.3) 3679.72,2450.28 U1.Y10@3731.5,2502.05
  Bottom Layer w5: 3261.96,2557.4 ccw(c3266.55,2555.43) 3261.85,2557.13 ccw(c3312.49,2539.28) 3258.8,2539.28 3258.8,2504.27 ccw(c3287.82,2504.27) 3267.3,2483.75 ccw(c3288.41,2504.87) 3288.41,2475 3327.93,2475 cw(c3327.93,2457.93) 3340,2470 3342.22,2467.78 ; 3261.97,2557.44 cw(c3332.74,2526.49) 3274.52,2577.25 3346.06,2648.78 ccw(c3342.5,2652.3) 3347.5,2652.3 3347.5,2653.96 ; 3342.23,2467.77 cw(c3323.44,2449) v2(3350,2449) ; 3347.5,2654 3347.5,2951.02 ccw(c3339,2951.02) 3345,2957.04 3340.98,2961.06 3339.59,2962.46 cw(c3349.5,2972.34) 3335.5,2972.34 3335.5,3505 cw(c3384.99,3505) 3349.98,3539.98 3385,3575 cw(c3418.08,3541.92) 3418.08,3588.7 U4.110@3459.88,3588.7
TMR8: U1.V17 U4.24 | length 1090.8
  Top Layer w5: v1(3936.22,2549.29) U1.V17@3951.97,2565.04
  Int1 (Sign) w3: v1(3936.22,2549.29) 3939.15,2552.22 cw(c3970,2521.37) 3970,2565 3983.58,2565 ccw(c3983.58,2665) 4054.29,2594.29 4075,2615 cw(c4106.38,2583.62) 4080,2619.31
  Int1 (Sign) w4: 4080,2619.31 cw(c4106.38,2583.62) 4106.38,2628 4148.62,2628 ccw(c4148.62,2683.69) 4187.94,2644.25 ccw(c4148.62,2683.69) 4188,2644.31 cw(c4225.87,2606.43) 4225.87,2660 v2(4315,2660)
  Bottom Layer w4: U4.24@4255.16,3273.74 4285.97,3273.74 cw(c4285.97,3260.97) 4295,3270 cw(c4281.35,3256.35) 4300.65,3256.35 4300.65,2690 ccw(c4338.44,2690) 4307.88,2667.77 ccw(c4338.44,2690) 4311.71,2663.29 v2(4315,2660)
TMR9: U1.V18 U4.25 | length 1029.9
  Top Layer w5: v1(3967.72,2549.29) U1.V18@3983.46,2565.04
  Int1 (Sign) w3: v1(3967.72,2549.29) 3987.87,2549.29 ccw(c3987.87,2649.29) 4058.58,2578.58 4080,2600
  Int1 (Sign) w4: 4080,2600 cw(c4128.28,2551.72) 4128.28,2620 4167.93,2620 ccw(c4167.93,2637.07) 4180,2625 cw(c4217.19,2587.81) 4185.79,2630 cw(c4217.19,2587.81) 4217.19,2640.41 v2(4300.65,2640.41)
  Bottom Layer w4: U4.25@4255.16,3254.05 4279.47,3254.05 cw(c4279.47,3235.41) 4292.65,3248.59 v2@4292.65,2640.41
TMR10: U1.U17 U4.26 | length 989.2
  Top Layer w5: U1.U17@3951.97,2596.54 v1(3967.72,2580.79)
  Int1 (Sign) w3: v1(3967.72,2580.79) 3967.72,2607.28 3945.22,2629.78 3930.22,2629.78 3918.72,2641.28 3918.72,2712.57 ccw(c3914.02,2712.57) 3917.35,2715.9 3908.97,2724.27 3898.93,2724.27 3890,2733.19 3890,2963.81 3898.93,2972.74 3912.74,2972.74 3922.22,2982.22 3922.22,2996.04 3931.19,3005 3960,3005 3966,3011 4070.8,3011 4074.4,3011.65 ccw(c4073.69,3015.59) 4074.93,3011.79 4080,3013.45
  Int1 (Sign) w4: 4080,3013.45 4086.84,3015.36 ccw(c4073.28,3063.77) 4101.29,3022.02 ; v2(4088.72,3152.41) 4092.16,3150.21 cw(c4050.37,3115.03) 4099.58,3138.76 cw(c4050.37,3115.03) 4104.47,3122.63 cw(c4050.37,3115.03) 4105,3115.03 4105,3114.97 4105,3080 4105,3057.56 4105,3051.81 ccw(c4109,3051.81) 4105.85,3049.35 cw(c4093.23,3039.51) 4107.97,3045.74 4107.99,3045.69 cw(c4093.23,3039.51) 4108.15,3033.72 4108.12,3033.63 ccw(c4111.86,3032.23) 4107.89,3032.69 cw(c4094.64,3034.24) 4106.57,3028.27 cw(c4094.64,3034.24) 4104.07,3024.8 4101.31,3022.04
  Bottom Layer w4: v2(4088.72,3152.41) 4092.63,3155 4148.79,3155 ccw(c4148.79,3206.21) 4184.99,3169.99 4200,3185 cw(c4224.14,3160.86) 4224.14,3195 U4.26@4232.58,3195
UART0_RX: U1.V20 U4.192 | length 2300.4
  Top Layer w5: v2(3255,2372.12) 3266.75,2383.87 cw(c3290,2360.62) 3290,2393.5 3689.76,2393.5 ccw(c3689.76,2438.74) 3721.73,2406.73 cw(c3753.74,2374.76) 3753.74,2420 4028.79,2420 ccw(c4028.79,2471.21) 4064.99,2434.99 4072.5,2442.5 ccw(c4054.39,2460.61) 4079.38,2455 ccw(c4054.39,2460.61) 4080,2460.57 ; U1.V20@4046.46,2565.04 4068.34,2543.16 cw(c4040.17,2515) 4080,2515 4080,2460.61
  Bottom Layer w4: U4.192@3219.72,3608.39 3168.17,3608.39 ccw(c3168.17,3596.83) 3160,3605 ccw(c3172.07,3592.93) 3155,3592.93 3155,2653.71 ccw(c3255,2653.71) 3155.22,2647.12 ccw(c3255,2653.71) 3184.29,2583 3201.07,2566.21 cw(c3149.86,2515) 3222.29,2515
  Bottom Layer w5: 3222.29,2515 3222.29,2446.25 ccw(c3322.29,2446.25) 3224.18,2426.88 ccw(c3322.29,2446.25) 3251.58,2375.54 v2(3255,2372.12)
UART0_TX: U1.R17 U4.193 | length 1773.7
  Top Layer w5: v1(3936.22,2644) 3936.33,2644 3951.86,2659.53 U1.R17@3951.97,2659.53
  Int4 (Sign) w3: 3395,2626.28 3906.35,2626.28 ccw(c3906.35,2656.15) 3927.45,2635.01 ; 3927.47,2635.03 3936.22,2643.78 v1(3936.22,2644)
  Int4 (Sign) w4: v2(3265,3630) 3265,3543.28 cw(c3196.72,3543.28) 3252.21,3503.5 ccw(c3330,3428.58) 3244.9,3495.08 ccw(c3292.95,3447.03) 3225,3447.03 3225,2703.69 ccw(c3325,2703.69) 3254.29,2632.98 ccw(c3270.46,2649.16) 3270.46,2626.28 3395,2626.28
  Bottom Layer w4: U4.193@3219.72,3628.07 3220.69,3629.04 3264.04,3629.04 v2(3265,3630)
UART1_RX: U1.U14 U4.23 | length 1449.9
  Top Layer w5: U1.U14@3857.48,2596.54 v1(3873.23,2580.79)
  Int3 (Sign) w3: v1(3873.23,2580.79) 3888.98,2565.04 v2@3888.98,2455
  Int3 (Sign) w5: v2(3888,2451) v2@3888.98,2455
  Int4 (Sign) w4: v2(3888,2451) 3888,2450.52 ccw(c3908.56,2450.52) 3894.02,2435.98 3900,2430 ccw(c3912.07,2442.07) 3912.07,2425 4136.72,2425 ccw(c4136.72,2493.28) 4185,2445 4187.32,2447.32 ccw(c4144.64,2490) 4205,2490 4205,2523.79 cw(c4256.21,2523.79) 4205.01,2525.01 cw(c4256.21,2523.79) 4220,2560 cw(c4253.7,2526.3) 4253.7,2573.96 4268.1,2573.96 v2(4270.66,2573.03)
  Bottom Layer w4: U4.23@4255.16,3293.43 4291.73,3293.43 cw(c4291.73,3281.73) 4300,3290 cw(c4279.11,3269.11) 4308.65,3269.11 4308.65,2704.35 ccw(c4336.87,2704.35) 4316.92,2684.4 4325.18,2676.13 cw(c4310.72,2661.67) 4331.17,2661.67 4331,2653.37 cw(c4282.72,2653.37) 4316.88,2619.25 ; v2(4270.66,2573.03) 4316.86,2619.23
UART1_TX: U1.W18 U4.22 | length 903.6
  Int3 (Sign) w4: v2(4188.05,3323.05) 4197.83,3327.17 4234.39,3290.61 cw(c4208.79,3265) 4245,3265 4245,2690.36 ccw(c4330.36,2690.36) 4270,2630 4284.03,2615.97 cw(c4257.55,2589.49) 4295,2589.49 cw(c4244.66,2590) 4280.26,2554.4 v2(4271,2545.15)
  Bottom Layer w4: v2(4188.05,3323.05) ccw(c4212.04,3347.04) 4212.04,3313.11 U4.22@4255.16,3313.11
UART2_RX: U1.Y3 U4.124 | length 1094.4
  Top Layer w5: v1(3497.78,2490) 3498.38,2490 3510.43,2502.05 U1.Y3@3511.02,2502.05
  Int1 (Sign) w3: 3460,3140 3460,3115 cw(c3363.43,3115) 3447.18,3066.91 cw(c3363.43,3115) 3431.72,3046.72 3410.81,3025.81 ccw(c3446.7,2990) 3396,2990 3396,2846.36 ccw(c3411.36,2846.36) 3400.5,2835.5 3468.69,2767.31 cw(c3441.37,2740) 3480,2740 3480,2520 ccw(c3518.44,2520) 3491.24,2492.84 v1(3497.78,2490)
  Int1 (Sign) w5: v2(3396,3320) 3442.93,3320 cw(c3442.93,3302.93) 3455,3315 cw(c3442.93,3302.93) 3460,3302.93 3460,3140
  Bottom Layer w5: v2(3396,3320) 3396,3316 3378.5,3298.5 3378.5,3283.17 3388.17,3273.5 3459.64,3273.5 U4.124@3459.88,3273.74
UART2_TX: U1.Y4 U4.123 | length 1086.1
  Top Layer w5: v1(3526.77,2490) 3528.62,2490 3540.67,2502.05 U1.Y4@3542.52,2502.05
  Int1 (Sign) w3: 3395,2826.5 3418.42,2803.08 3436.22,2785.28 cw(c3413.76,2762.82) 3442.66,2776.01 cw(c3413.76,2762.82) 3445.52,2763.11 3445.87,2761.02 cw(c3409.88,2755) 3446.05,2759.83 3446.37,2757.49 3447,2486.27 ccw(c3466.96,2486.27) 3447.28,2482.96 ccw(c3466.96,2486.27) 3452.85,2472.15 3455,2470 ccw(c3470.37,2485.37) 3470.37,2463.64 3492,2463.64 ccw(c3492,2492.86) 3512.67,2472.2 3525.89,2485.42 v1(3526.77,2490) ; 3395,3019.13 cw(c3425,2995) 3397.78,3022.22 3430.28,3054.73 ccw(c3398.97,3086.04) 3431.48,3055.98 ccw(c3384.37,3103.1) 3437.52,3062.92 ccw(c3435.14,3064.74) 3437.58,3063 ccw(c3363.43,3115) 3446.03,3077.84 ccw(c3443.3,3079.08) 3446.07,3077.93 ccw(c3384.37,3103.1) 3451,3103.1 3451,3140
  Int1 (Sign) w5: 3395,2826.5 3386.5,2835 3386.5,2995 cw(c3425,2995) 3395,3019.13 ; v2(3395.97,3290.54) 3431.62,3290.54 cw(c3431.62,3271.62) 3445,3285 cw(c3420.86,3260.86) 3450.33,3278.1 cw(c3446,3275.59) 3451,3275.56 3451,3140
  Bottom Layer w5: v2(3395.97,3290.54) 3454.34,3290 ccw(c3454.39,3295) 3457.92,3291.46 U4.123@3459.88,3293.43
UART3_RX: U1.V7 U4.126 | length 1070.6
  Top Layer w5: v1(3621.26,2549.29) U1.V7@3637.01,2565.04
  Int3 (Sign) w3: v2@3604,2455 3604,2532.03 v1(3621.26,2549.29)
  Int4 (Sign) w4: v2@3603.5,2454.5 v2(3604,2454.5)
  Bottom Layer w3: 3395,2590 3421.32,2563.68 3606.87,2563.68 v1(3621.26,2549.29)
  Bottom Layer w4: 3395,2590 3380.61,2604.39 cw(c3406.21,2630) 3374.5,2612.51 cw(c3378.01,2614.44) 3374.01,2614.44 3374,2630 3374,2968.27 ccw(c3343.27,2968.27) 3365,2990 cw(c3372.24,2997.24) 3362,2997.24 3362,3170 cw(c3386.14,3170) 3369.07,3187.07 cw(c3388.21,3167.93) 3388.21,3195 U4.126@3459.88,3195
UART3_TX: U1.W6 U4.125 | length 1163.4
  Top Layer w5: v1(3589.76,2517.8) U1.W6@3605.51,2533.54
  Int1 (Sign) w3: 3395.02,2799.98 3407.51,2787.49 3427.8,2767.2 cw(c3411.94,2751.34) 3432.58,2760.11 cw(c3411.94,2751.34) 3434.35,2752.42 cw(c3411.94,2751.34) 3434.37,2751.34 3434.37,2661.89 cw(c3388.77,2661.89) 3426.03,2635.6 cw(c3388.77,2661.89) 3424.09,2633.05 cw(c3419.41,2636.81) 3423.86,2632.78 ; 3395,3050 3420,3075 ccw(c3398.58,3096.42) 3428.87,3096.41 3428.58,3140 ; 3412.27,2482.52 ccw(c3421.27,2482.7) 3412.68,2480.03 ; 3412.27,2482.53 cw(c3424.35,2482.73) 3412.27,2482.7 ; 3412.27,2482.73 3412.28,2612.29 cw(c3432.28,2612.28) 3417.45,2625.7 3423.85,2632.76 ; 3412.68,2480.01 3413.45,2477.52 ccw(c3424.35,2482.73) 3415.81,2474.19 3434.99,2455 ; 3573.98,2455 3573.98,2480.52 cw(c3625.84,2480.52) 3589.17,2517.2 v1(3589.76,2517.8)
  Int1 (Sign) w4: 3395.02,2799.98 cw(c3397.51,2802.44) 3394.87,2800.15 3374.03,2824.2 cw(c3386.5,2835) 3370,2835 3370,3000 cw(c3430.36,3000) 3387.68,3042.68 3395,3050 ; v2(3405,3254) 3405.71,3253.29 cw(c3350.81,3198.39) 3422.31,3228.65 cw(c3350.81,3198.39) 3428.45,3198.39 3428.45,3159.99 3428.58,3140 ; 3434.99,2455 3439.81,2450.19 ccw(c3442.62,2453.03) 3440.65,2449.55 3447.01,2445.95 ccw(c3475.34,2496.04) 3455.74,2441.94 3462.18,2439.61 ccw(c3466.07,2450.43) 3463.71,2439.17 ccw(c3475.34,2496.04) 3475.34,2438 3495,2438 3560,2438 3561.93,2438.49 ccw(c3558.02,2454) 3564.85,2439.53 ccw(c3558.02,2454) 3573.98,2452.87 3573.98,2455
  Bottom Layer w4: v2(3405,3254) 3406.99,3254.53 3459.41,3254.53 U4.125@3459.88,3254.05
VDD_RTC: U1.E13 U4.72 | length 352.5
  Top Layer w5: v1(3810.24,2958.74) U1.E13@3825.98,2974.49
  Int3 (Sign) w3: v1(3810.24,2958.74) 3824.62,2973.12 3844.41,2973.12 3855.73,2984.44 3855.73,2992.54 3870.93,3007.73 3910.52,3007.73 3921,3018.21 3933.21,3018.21 v1(3935,3020)
  Bottom Layer w3: v1(3935,3020) 3950.36,3035.36 3950.36,3040.36 3953.22,3043.22 3953.22,3119.01 3970.15,3135.94 U4.72@4015,3135.94
pads on no net: D1.2 RN9.2 RN9.4 RN9.5 RN9.7 U1.A12 U1.B1 U1.B10 U1.B19 U1.C1 U1.C2 U1.C3 U1.C16 U1.C17 U1.C18 U1.D2 U1.D3 U1.D6 U1.D9 U1.D10 U1.D11 U1.D18 U1.E1 U1.E2 U1.E4 U1.E6 U1.F1 U1.F2 U1.F4 U1.F5 U1.G1 U1.G2 U1.G3 U1.G4 U1.H1 U1.H2 U1.H4 U1.J1 U1.J2 U1.J3 U1.J4 U1.K1 U1.K2 U1.K3 U1.K4 U1.K5 U1.L1 U1.L2 U1.L3 U1.L4 U1.L5 U1.L16 U1.M1 U1.M2 U1.M3 U1.M4 U1.M5 U1.M16 U1.M18 U1.N1 U1.N2 U1.N3 U1.N4 U1.N16 U1.N17 U1.N18 U1.N19 U1.P1 U1.P2 U1.P3 U1.P4 U1.P5 U1.P17 U1.P18 U1.P20 U1.R1 U1.R2 U1.R3 U1.R4 U1.R19 U1.T1 U1.T2 U1.T3 U1.T4 U1.T17 U1.T18 U1.T19 U1.T20 U1.U1 U1.U2 U1.U3 U1.U4 U1.U6 U1.U10 U1.U11 U1.U12 U1.U15 U1.U16 U1.U18 U1.U19 U1.U20 U1.V1 U1.V2 U1.V9 U1.V10 U1.V14 U1.V15 U1.V16 U1.V19 U1.W9 U1.W10 U1.W11 U1.W12 U1.W16 U1.W17 U1.W19 U1.W20 U1.Y5 U1.Y6 U1.Y8 U1.Y9 U1.Y11 U1.Y12 U1.Y16 U1.Y17 U1.Y18 U1.Y19 U2.F9 U3.B6 U3.B8 U3.E8 U3.F1 U3.G2 U3.H1 U3.H8 U4.1 U4.2 U4.3 U4.4 U4.5 U4.6 U4.7 U4.8 U4.9 U4.10 U4.11 U4.12 U4.13 U4.14 U4.15 U4.16 U4.17 U4.18 U4.19 U4.20 U4.21 U4.27 U4.28 U4.29 U4.30 U4.31 U4.32 U4.33 U4.35 U4.36 U4.37 U4.38 U4.39 U4.40 U4.41 U4.42 U4.43 U4.44 U4.45 U4.46 U4.47 U4.48 U4.49 U4.50 U4.62 U4.63 U4.65 U4.66 U4.69 U4.70 U4.73 U4.74 U4.75 U4.77 U4.78 U4.79 U4.80 U4.81 U4.82 U4.83 U4.84 U4.85 U4.86 U4.95 U4.96 U4.97 U4.98 U4.99 U4.100 U4.101 U4.103 U4.104 U4.105 U4.107 U4.108 U4.109 U4.111 U4.112 U4.113 U4.114 U4.116 U4.122 U4.131 U4.132 U4.133 U4.135 U4.136 U4.137 U4.138 U4.139 U4.140 U4.141 U4.142 U4.143 U4.144 U4.145 U4.146 U4.147 U4.148 U4.149 U4.150 U4.155 U4.156 U4.157 U4.158 U4.159 U4.160 U4.161 U4.162 U4.163 U4.164 U4.165 U4.166 U4.167 U4.168 U4.169 U4.170 U4.171 U4.172 U4.173 U4.174 U4.175 U4.176 U4.177 U4.178 U4.179 U4.180 U4.181 U4.182 U4.185 U4.186 U4.187 U4.188 U4.189 U4.190 U4.191 U4.194 U4.195 U4.196 U4.197 U4.198 U4.199 U4.200 U4.211 U4.212 U4.223 U4.224 U4.h1 U4.h2 U4.h3 U4.h4 U4.H5 U4.H6 Y2.2 Y2.3
copper on no net: | length 2626.4
  Top Layer w5: 3416.03,2643.78 3463.78,2643.78 3479.53,2659.53 ; 3416.03,2659.53 3448.03,2659.53 ; 3416.03,2675.28 3463.78,2675.28 3479.53,2691.02 ; 3416.03,2691.02 3448.03,2691.02 ; 3416.03,2706.77 3463.78,2706.77 3479.53,2722.52 ; 3416.03,2722.52 3448.03,2722.52 ; 3416.03,2738.27 3463.78,2738.27 3479.53,2754.02 ; 3416.03,2769.76 3463.78,2769.76 3479.53,2785.51 ; 3416.03,2785.51 3448.03,2785.51 ; 3416.03,2801.26 3463.78,2801.26 3479.53,2817.01 ; 3416.03,2927.24 3463.78,2927.24 3479.53,2942.99 ; 3416.03,2942.99 3448.03,2942.99 ; 3416.03,2958.74 3463.78,2958.74 3479.53,2974.49 ; 3416.03,2974.49 3448.03,2974.49 ; 3416.03,2990.24 3463.78,2990.24 3479.53,3005.98 ; 3416.03,3021.73 3463.78,3021.73 3479.53,3037.48 ; 3416.03,3037.48 3448.03,3037.48 ; v1(3432.28,2549.29) 3448.03,2565.04 ; v1(3432.28,2580.79) 3448.03,2596.54 ; v1(3432.28,2612.28) 3448.03,2628.03 ; v1(3463.78,2549.29) 3479.53,2565.04 ; v1(3463.78,2580.79) 3479.53,2596.54 ; v1(3463.78,2612.28) 3479.53,2628.03 ; v1(3495.28,2580.79) 3511.02,2596.54 ; v1(3495.28,2612.28) 3511.02,2628.03 ; 3511.02,2659.53 v1(3526.77,2675.28) ; 3511.02,2691.02 v1(3526.77,2706.77) ; 3511.02,2722.52 v1(3526.77,2738.27) ; 3511.02,2754.02 v1(3526.77,2769.76) ; 3511.02,2817.01 v1(3526.77,2801.26) ; 3511.02,2848.5 v1(3526.77,2832.76) ; 3511.02,2911.5 v1(3526.77,2895.75) ; 3511.02,3005.98 v1(3526.77,2990.24) ; 3511.02,3037.48 v1(3526.77,3021.73) ; v1(3526.77,2580.79) 3542.52,2596.54 ; v1(3526.77,2612.28) 3542.52,2628.03 ; v1(3526.77,2643.78) 3542.52,2659.53 ; 3542.52,2691.02 v1(3558.27,2706.77) ; 3542.52,2722.52 v1(3558.27,2738.27) ; 3542.52,2754.02 v1(3558.27,2769.76) ; 3542.52,2785.51 v1(3558.27,2801.26) ; 3542.52,2817.01 v1(3558.27,2832.76) ; 3542.52,2848.5 v1(3558.27,2864.25) ; 3542.52,2880 v1(3558.27,2895.75) ; 3542.52,2911.5 v1(3558.27,2927.24) ; 3542.52,2942.99 v1(3558.27,2958.74) ; 3542.52,2974.49 v1(3558.27,2990.24) ; v1(3558.27,2486.3) 3574.02,2502.05 ; v1(3558.27,2675.28) 3574.02,2691.02 ; 3574.02,2754.02 v1(3589.76,2769.76) ; 3574.02,2785.51 v1(3589.76,2801.26) ; 3574.02,2817.01 v1(3589.76,2832.76) ; 3574.02,2942.99 v1(3589.76,2958.74) ; v1(3589.76,2486.3) 3605.51,2502.05 ; v1(3589.76,2580.79) 3605.51,2596.54 ; 3605.51,2974.49 v1(3621.26,2990.24) ; 3605.51,3005.98 v1(3621.26,3021.73) ; v1(3652.76,2486.3) 3668.5,2502.05 ; v1(3684.25,2486.3) 3700,2502.05 ; v1(3684.25,2517.8) 3700,2533.54 ; v1(3684.25,2549.29) 3700,2565.04 ; 3700,3005.98 v1(3715.75,3021.73) ; v1(3715.75,2517.8) 3731.5,2533.54 ; v1(3715.75,2549.29) 3731.5,2565.04 ; v1(3715.75,2580.79) 3731.5,2596.54 ; 3731.5,3005.98 v1(3747.24,3021.73) ; 3731.5,3068.98 v1(3747.24,3084.72) ; v1(3747.24,2486.3) 3762.99,2502.05 ; v1(3747.24,2517.8) 3762.99,2533.54 ; 3762.99,2596.54 v1(3778.74,2580.79) ; 3762.99,3005.98 v1(3778.74,3021.73) ; v1(3778.74,2486.3) 3794.49,2502.05 ; v1(3778.74,2517.8) 3794.49,2533.54 ; 3794.49,2596.54 v1(3810.24,2580.79) ; 3794.49,3100.47 v1(3810.24,3116.22) ; v1(3841.73,2549.29) 3857.48,2565.04 ; v1(3873.23,2549.29) 3888.98,2565.04 ; 3888.98,2596.54 v1(3904.72,2580.79) ; v1(3904.72,2486.3) 3920.47,2502.05 ; v1(3904.72,2517.8) 3920.47,2533.54 ; v1(3904.72,2549.29) 3920.47,2565.04 ; v1(3904.72,2706.77) 3920.47,2722.52 ; v1(3904.72,2738.27) 3920.47,2754.02 ; v1(3904.72,2769.76) 3920.47,2785.51 ; v1(3904.72,3021.73) 3920.47,3037.48 ; 3920.47,2596.54 v1(3936.22,2580.79) ; v1(3936.22,2486.3) 3951.97,2502.05 ; v1(3936.22,2517.8) 3951.97,2533.54 ; v1(3936.22,2675.28) 3951.97,2691.02 ; v1(3967.72,2486.3) 3983.46,2502.05 ; v1(3967.72,2675.28) 3983.46,2691.02 ; v1(3999.21,2486.3) 4014.96,2502.05
  Bottom Layer w4: 4130,2486.05 4135.08,2491.13 4135.08,2515.87

## Polygon pours and split planes (outlines as drawn)
+3V3 on Int5 (PWR) (split plane): 6979.9,1020.1 1020.1,1020.1 1020.1,4979.9 6979.9,4979.9
GND on Int2 (GND) (split plane): 6979.9,1020.1 1020.1,1020.1 1020.1,4979.9 6979.9,4979.9

## Text inside footprints (layer, text, board x,y; h text height)
RN1: Top Overlay "*" at 3825,3515 h50 r90; Mechanical 13 "*" at 3843,3597 h50 r90
RN2: Top Overlay "*" at 3610,3545 h50 r90; Mechanical 13 "*" at 3628,3627 h50 r90
RN3: Top Overlay "*" at 3320,3790 h50; Mechanical 13 "*" at 3402,3772 h50
RN4: Top Overlay "*" at 4155,3700 h50 r180; Mechanical 13 "*" at 4073,3718 h50 r180
RN5: Top Overlay "*" at 4165.5,4175.5 h50 r180; Mechanical 13 "*" at 4083.5,4193.5 h50 r180
RN6: Top Overlay "*" at 4165.5,3966.35 h50 r180; Mechanical 13 "*" at 4083.5,3984.35 h50 r180
RN7: Top Overlay "*" at 4355,3815 h50 r180; Mechanical 13 "*" at 4273,3833 h50 r180
RN8: Top Overlay "*" at 3300,4000 h50; Mechanical 13 "*" at 3402,3982 h50
RN9: Top Overlay "*" at 3209.5,3665.5 h50 r90; Mechanical 13 "*" at 3227.5,3747.5 h50 r90
RN10: Top Overlay "*" at 3320,4210 h50; Mechanical 13 "*" at 3402,4192 h50